# Altium PCB switch-box.PcbDoc (part 1 of 2)
Units mil, origin at the board's own origin, x right, y up, seen from the top; angles counter-clockwise.
Board outline 6910 x 3465 mil, 2 copper layers (Top Layer, Bottom Layer), stack 57 mil thick; 96 components, 105 nets, 379 pads, 100 vias.
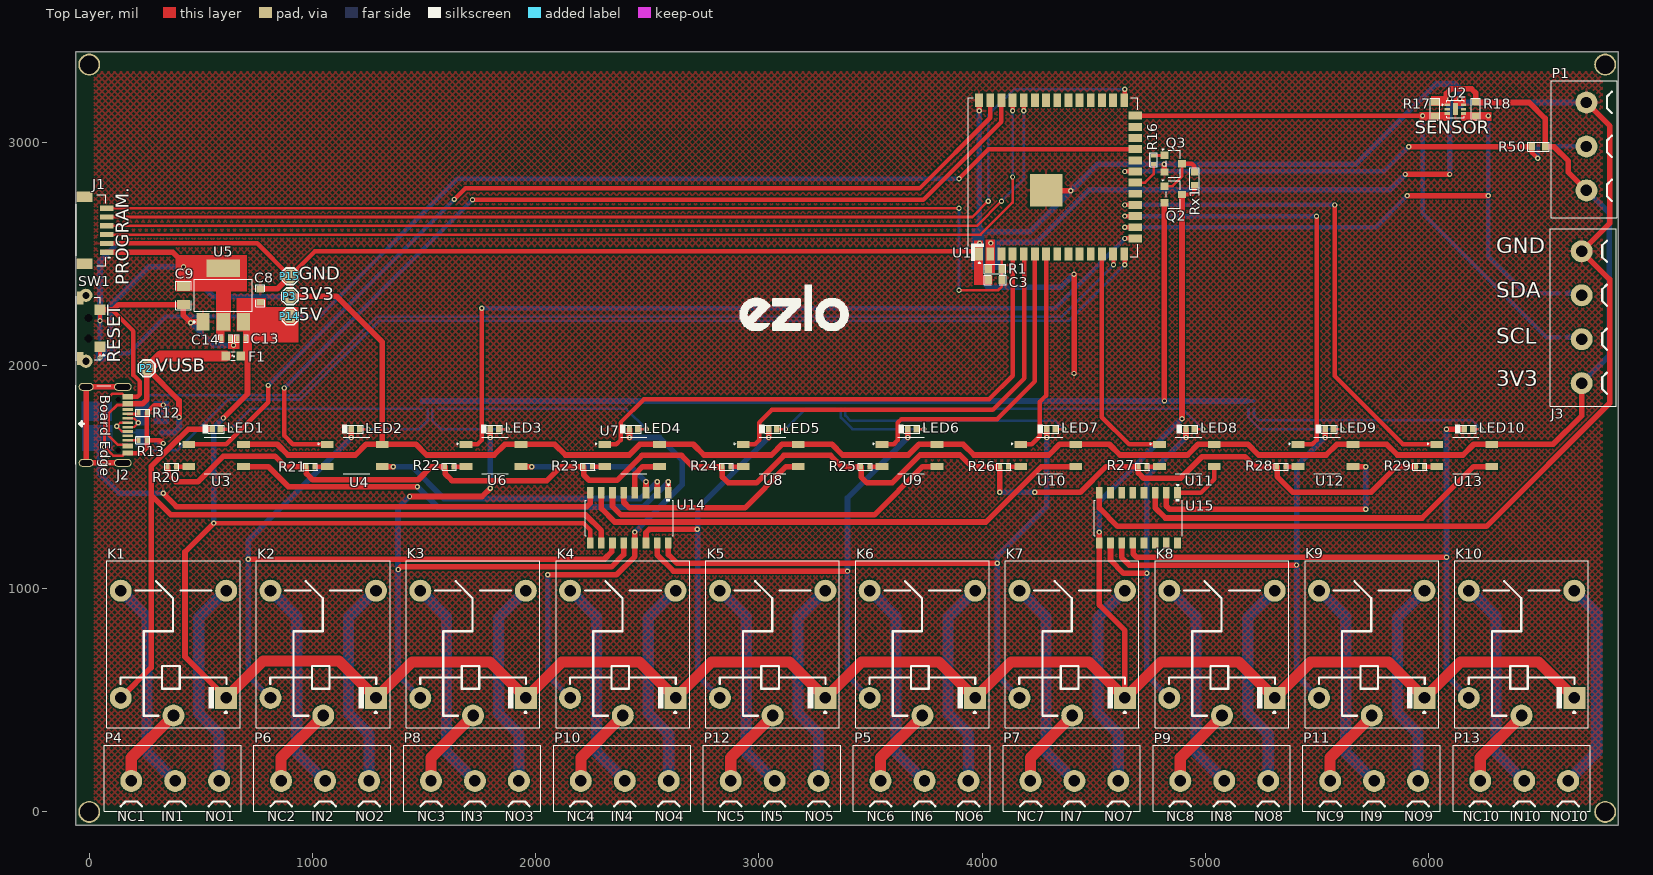
[diagram p0: Top Layer view]
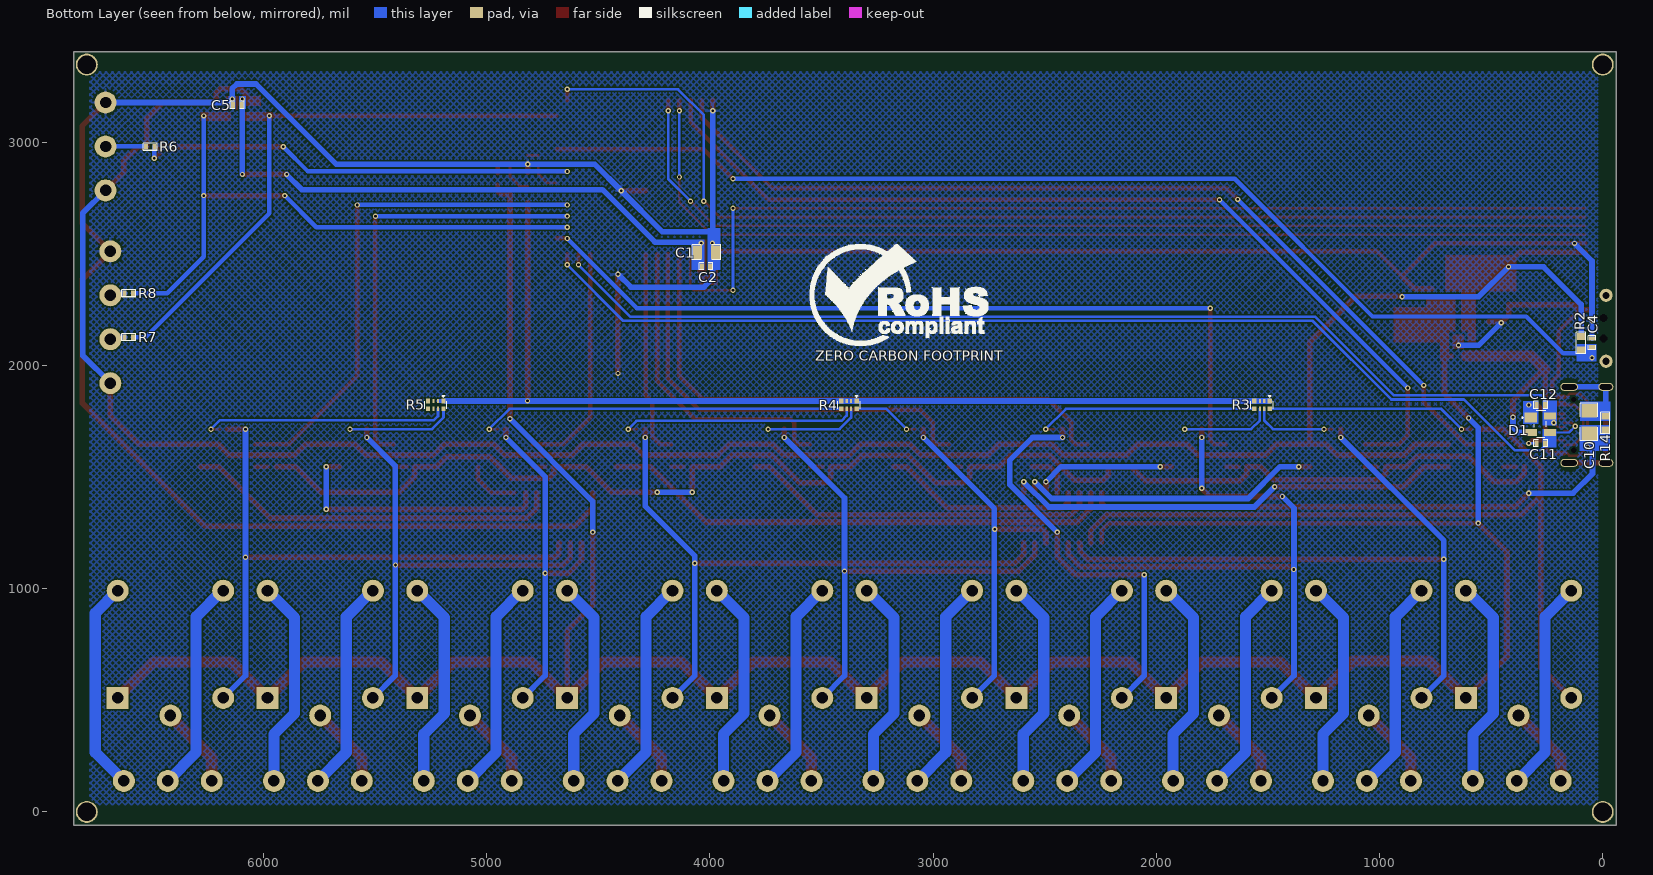
[diagram p1: Bottom Layer view, seen from below]

## Layer stack, top to bottom
Top Solder: solder mask 3, Solder Resist, Dk 3.5
Top Layer: signal copper 10
Dielectric 1: core 37, Core-041, Dk 4.8
Bottom Layer: signal copper 10
Bottom Solder: solder mask 3, Solder Resist, Dk 3.5

## Board outline
-60,-59 6850,-59 6850,3406 -60,3406

## Design rules (kind name [scope] priority, off if disabled: settings)
Clearance [All] p1: gap=6 ignorepadtopadclearanceinfootprint=FALSE except(4: Arc-SMDPad Track-SMDPad SMDPad-SMDPad)
ComponentClearance [All] p1: gap=0 collisioncheckmode=3 verticalgap=0 showdistances=FALSE
HoleSize [All] p1: absolutevalues=TRUE maxlimit=10000 minlimit=1 maxpercent=80.000 minpercent=20.000
HoleToHoleClearance [All] p1: gap=0 allowstackedmicrovias=TRUE
MinimumSolderMaskSliver [All] p1: minsoldermaskwidth=0
PolygonConnect [All] p1: connectstyle=Relief reliefconductorwidth=10 reliefentries=4 polygonreliefangle="90 Angle" airgapwidth=10
RoutingVias [All] p1: holewidth=11.81 width=23.62 viastyle="Through Hole" minholewidth=11.81 minwidth=23.62 maxholewidth=31.5 maxwidth=62.99
SilkToSilkClearance [All] p1: silktosilkclearance=0
SilkToSolderMaskClearance [IsPad] p1: minsilkscreentomaskgap=0 clearancetoexposedcopper=TRUE
SolderMaskExpansion [All] p1: expansion=4 istentingtop=FALSE
Width [All] p1: maxlimit=50 minlimit=10 preferedwidth=15 minimp=50.000000 maximp=50.000000 favimp=50.000000
24 further rules are at their usual default settings.

## Classes and differential pairs
component class "U_USB & LDO_Section": C8 C9 C10 C11 C12 C13 C14 D1 F1 J2 P2 P3 P14 P15 R12 R13 R14 U5
component class U_Sensor_Section: C5 J3 R7 R8 R17 R18 U2
component class U_Relay_Section: K1 K2 K3 K4 K5 K6 K7 K8 K9 K10
component class U_Isolator_Section: R20 R21 R22 R23 R24 R25 R26 R27 R28 R29 U3 U4 U6 U7 U8 U9 U10 U11 U12 U13
component class U_Driver_Section: D13 D14 D15 D16 D17 D18 D19 D20 D21 D22 U14 U15
component class U_Controller_Section: C1 C2 C3 C4 J1 LED1 LED2 LED3 LED4 LED5 LED6 LED7 LED8 LED9 LED10 P1 Q2 Q3 R1 R2 R3 R4 R5 R6 R16 R50 Rx1 SW1 U1
component class U_Connector_Section: P4 P5 P6 P7 P8 P9 P10 P11 P12 P13

## Components (designator, comment, footprint, x,y, rotation, side; value= is the part's Value field where it differs from the comment)
C1 "22uF" Cap-0805 4015,2507 r180 bottom locked
C2 "0.1uF" Cap-0402 4017,2445 r180 bottom locked
C3 "1uF" Cap-0603 4058,2383 r0 top locked
C4 "0.1uF" Cap-0402 48,2102 r270 bottom locked
C5 "0.1uF" Cap-0402 6117,3167 r0 bottom locked
C8 "10uF" Cap-0603 766,2313 r90 top locked
C9 "22uF" Cap-0805 422,2313 r270 top locked
C10 "4.7nF" Cap-1206 61,1747 r270 bottom locked
C11 "TBD" Cap-0402 278,1651 r0 bottom locked
C12 "TBD" Cap-0402 278,1823 r0 bottom locked
C13 "1uF" Cap-0402 682,2121 r180 top locked
C14 "4.7uF" Cap-0402 611,2121 r0 top locked
D1 "SP0503BAHTG" SOT-143-4_ 322.61,1766.93 r180 bottom locked
F1 "BSMD0603L-100" fuse-0603 645,2042 r0 top locked
J1 "Voltlink Target" "VOLTLINK TARGET" 28,2606 r90 top locked
J2 "TYPE-C-31-M-12" TYPE-C-31-M-12_ 173,1859.83 r270 top locked
J3 "WJ301V-5.0-4P-12-00A" WJ301V-5.0-4P-12-00A 6685.64,2216.15 r90 top locked
K1 "JQC-3FF/005-1ZS(551)" JQC-3FF/005-1ZS(551) 377.31,750.9 r90 top locked
K2 "JQC-3FF/005-1ZS(551)" JQC-3FF/005-1ZS(551) 1048.33,750.9 r90 top locked
K3 "JQC-3FF/005-1ZS(551)" JQC-3FF/005-1ZS(551) 1719.34,750.9 r90 top locked
K4 "JQC-3FF/005-1ZS(551)" JQC-3FF/005-1ZS(551) 2390.36,750.9 r90 top locked
K5 "JQC-3FF/005-1ZS(551)" JQC-3FF/005-1ZS(551) 3061.38,750.9 r90 top locked
K6 "JQC-3FF/005-1ZS(551)" JQC-3FF/005-1ZS(551) 3732.39,750.9 r90 top locked
K7 "JQC-3FF/005-1ZS(551)" JQC-3FF/005-1ZS(551) 4403.41,750.9 r90 top locked
K8 "JQC-3FF/005-1ZS(551)" JQC-3FF/005-1ZS(551) 5074.43,750.9 r90 top locked
K9 "JQC-3FF/005-1ZS(551)" JQC-3FF/005-1ZS(551) 5745.44,750.9 r90 top locked
K10 "JQC-3FF/005-1ZS(551)" JQC-3FF/005-1ZS(551) 6416.46,750.9 r90 top locked
LED1 "Green" LED-0402 569.06,1715 r180 top locked
LED2 "Green" LED-0402 1192.3,1715 r180 top locked
LED3 "Green" LED-0402 1815.54,1715 r180 top locked
LED4 "Green" LED-0402 2438.78,1715 r180 top locked
LED5 "Green" LED-0402 3062.02,1715 r180 top locked
LED6 "Green" LED-0402 3685.25,1715 r180 top locked
LED7 "Green" LED-0402 4308.49,1715 r180 top locked
LED8 "Green" LED-0402 4931.73,1715 r180 top locked
LED9 "Green" LED-0402 5554.97,1715 r180 top locked
LED10 "Green" LED-0402 6178.21,1715 r180 top locked
P1 "WJ301V-5.0-3P" WJ301V-5.0-3P 6707,2981.15 r90 top
P2 "TEST POINT" Test-point 258,1988 r0 top locked
P3 "TEST POINT" Test-point 899,2310 r0 top locked
P4 "WJ301V-5.0-3P" WJ301V-5.0-3P 385,139 r0 top locked
P5 "WJ301V-5.0-3P" WJ301V-5.0-3P 3741.75,139 r0 top locked
P6 "WJ301V-5.0-3P" WJ301V-5.0-3P 1056.35,139 r0 top locked
P7 "WJ301V-5.0-3P" WJ301V-5.0-3P 4413.1,139 r0 top locked
P8 "WJ301V-5.0-3P" WJ301V-5.0-3P 1727.7,139 r0 top locked
P9 "WJ301V-5.0-3P" WJ301V-5.0-3P 5084.45,139 r0 top locked
P10 "WJ301V-5.0-3P" WJ301V-5.0-3P 2399.05,139 r0 top locked
P11 "WJ301V-5.0-3P" WJ301V-5.0-3P 5755.8,139 r0 top locked
P12 "WJ301V-5.0-3P" WJ301V-5.0-3P 3070.4,139 r0 top locked
P13 "WJ301V-5.0-3P" WJ301V-5.0-3P 6428.15,139 r0 top locked
P14 "TEST POINT" Test-point 899,2220 r0 top locked
P15 "TEST POINT" Test-point 899,2400 r0 top locked
Q2 "FDN306P" SOT-23 4856,2766 r270 top locked
Q3 "S8050" SOT-23 4856,2904 r270 top locked
R1 "10K" RES-0603 4058,2432 r180 top locked
R2 "10K" RES-0603 97,2100 r90 bottom locked
R3 "330R" Res-0402x4 1491.22,1841 r270 bottom locked
R4 "330R" Res-0402x4 3342.06,1841 r270 bottom locked
R5 "330R" Res-0402x4 5192.9,1841 r270 bottom locked
R6 "47R" Res-0402 6507,2980 r180 bottom locked
R7 "47R" Res-0402 6603,2127 r180 bottom locked
R8 "47R" Res-0402 6603,2323 r180 bottom locked
R12 "5.1K" Res-0402 240,1788 r180 top locked
R13 "5.1K" Res-0402 240,1665 r180 top locked
R14 "1M" Res-0603 -11,1742 r90 bottom locked
R16 "100K" Res-0402 4768,2922 r270 top locked
R17 "10K" Res-0603 6029,3149 r90 top locked
R18 "10K" Res-0603 6211,3149 r90 top locked
R20 "100R" Res-0402 370,1547 r0 top locked
R21 "100R" Res-0402 991.22,1547 r0 top locked
R22 "100R" Res-0402 1612.44,1547 r0 top locked
R23 "100R" Res-0402 2233.67,1547 r0 top locked
R24 "100R" Res-0402 2854.89,1547 r0 top locked
R25 "100R" Res-0402 3476.11,1547 r0 top locked
R26 "100R" Res-0402 4097.33,1547 r0 top locked
R27 "100R" Res-0402 4718.56,1547 r0 top locked
R28 "100R" Res-0402 5339.78,1547 r0 top locked
R29 "100R" Res-0402 5961,1547 r0 top locked
R50 "10K" Res-0603 6492,2980 r0 top locked
Rx1 "10K" RES-0603 4952,2837 r90 top locked
SW1 "YTS-B003-2A" YTS-B003-2A 3.89,2166.72 r90 top locked
U1 "ESP32-S3-WROOM-1U-N4" "41-SMD UFL MODULE" 4336,2844 r90 top locked
U2 "GXHTC3" DFN-6-EP(2x2) 6119.66,3148.46 r0 top locked
U3 "IS181GB" SOP-4_2.54 568.27,1597 r0 top locked
U4 "IS181GB" SOP-4_2.54 1189.51,1597 r0 top locked
U5 "LDL1117S33R" "SOT- 223" 600.55,2316.08 r0 top locked
U6 "IS181GB" SOP-4_2.54 1810.75,1597 r0 top locked
U7 "IS181GB" SOP-4_2.54 2431.99,1597 r0 top locked
U8 "IS181GB" SOP-4_2.54 3053.23,1597 r0 top locked
U9 "IS181GB" SOP-4_2.54 3674.47,1597 r0 top locked
U10 "IS181GB" SOP-4_2.54 4295.71,1597 r0 top locked
U11 "IS181GB" SOP-4_2.54 4916.94,1597 r0 top locked
U12 "IS181GB" SOP-4_2.54 5538.18,1597 r0 top locked
U13 "IS181GB" SOP-4_2.54 6159.42,1597 r0 top locked
U14 "ULN2003AD" 16-SOIC 2594,1430 r270 top locked
U15 "ULN2003AD" 16-SOIC 4875,1430 r270 top locked

## Footprints (in the part's own frame and the unit in brackets; to place one, negate y for a bottom-side part, rotate by r counter-clockwise, add the part's x,y. Pads: shape width x height; smd on the part's side, far side on the other; paste and mask are expansions set on the pad)
16-SOIC [mm]
  rect 1.27x0.76 smd: 1(0,0) 2(0,-1.27) 3(0,-2.54) 4(0,-3.81) 5(0,-5.08) 6(0,-6.35) 7(0,-7.62) 8(0,-8.89) 9(5.72,-8.89) 10(5.72,-7.62) 11(5.72,-6.35) 12(5.72,-5.08) 13(5.72,-3.81) 14(5.72,-2.54) 15(5.72,-1.27) 16(5.72,0)
  silkscreen extent -0.91,-9.45 4.88,0.56, body extent -0.14,-9.4 5.86,0.51, height 1.75
"41-SMD UFL MODULE" [mm]
  rect 1.5x0.9 smd: 1(-8.75,8.88) 2(-8.75,7.61) 3(-8.75,6.34) 4(-8.75,5.07) 5(-8.75,3.8) 6(-8.75,2.53) 7(-8.75,1.26) 8(-8.75,-0.01) 9(-8.75,-1.28) 10(-8.75,-2.55) 11(-8.75,-3.82) 12(-8.75,-5.09) 13(-8.75,-6.36) 14(-8.75,-7.63) 27(8.75,-7.63) 28(8.75,-6.36) 29(8.75,-5.09) 30(8.75,-3.82) 31(8.75,-2.55) 32(8.75,-1.28) 33(8.75,-0.01) 34(8.75,1.26) 35(8.75,2.53) 36(8.75,3.8) 37(8.75,5.07) 38(8.75,6.34) 39(8.75,7.61) 40(8.75,8.88)
  rect 0.9x1.5 smd: 15(-6.98,-8.88) 16(-5.71,-8.88) 17(-4.44,-8.88) 18(-3.17,-8.88) 19(-1.9,-8.88) 20(-0.63,-8.88) 21(0.64,-8.88) 22(1.91,-8.88) 23(3.18,-8.88) 24(4.45,-8.88) 25(5.72,-8.88) 26(6.99,-8.88)
  rect 3.7x3.7 smd: 41(-1.5,1.26)
  silkscreen extent -9.8,-9.17 9.05,10.11, body extent -9,-9.12 10.99,123, height 7.73
Cap-0402 [mil]
  rect 18x25 smd mask+2.36: 1(-18.5,0) 2(18.5,0)
  silkscreen extent -31,-16 31,16, body extent -20,-10 20,10, height 19
Cap-0603 [mil]
  rect 30x35 smd mask+2.36: 1(-30,0) 2(30,0)
  silkscreen extent -49,-21 49,21, body extent -32,-16 31,16, height 34
Cap-0805 [mil] "SMD 0805"
  rect 40x60 smd mask+2.76: 1(-40,0) 2(40,0)
  silkscreen extent -64,-34 64,34, body extent -39,-25 39,25, height 30
Cap-1206 [mil] "SMD 1206"
  rect 60x70 smd: 1(-50,0) 2(50,0)
  silkscreen extent -84,-39 84,39, body extent -63,-31 63,32, height 39
DFN-6-EP(2x2) [mm]
  rect 0.6x0.3 smd: 1(-0.917,0.5) 2(-0.917,0) 3(-0.917,-0.5) 4(0.918,-0.5) 5(0.918,0) 6(0.918,0.5)
  rect 0.56x1.37 smd: 7(0,0)
  silkscreen extent -1.5,-1 1,1, body extent -1.01,-1 1.01,1, height 0.76
fuse-0603 [mm]
  rect 1x1 smd: 1(-0.85,0) 2(0.85,0)
  silkscreen extent -0.25,-0.48 0.25,0.48, body extent -0.77,-0.42 0.78,0.43, height 0.45
JQC-3FF/005-1ZS(551) [mm]
  rect 2.5x2.5 hole 1.32: 1(-6.1,-6)
  round 2.5 hole 1.32: 2(-6.1,6) 3(6.1,6) 4(-8.1,0) 5(6.1,-6)
  silkscreen extent -9.5,-7.6 9.5,7.61, body extent -9.5,-7.6 9.5,7.6, height 15
LED-0402 [mm]
  rect 0.62x0.72 smd: 1(-0.475,0) 2(0.475,0)
  silkscreen extent -0.89,-0.51 1.55,0.51, body extent -0.5,-0.25 0.51,0.25, height 0.45
Res-0402 [mil]
  rect 18x25 smd mask+2.17: 1(-18.5,0) 2(18.5,0)
  silkscreen extent -32,-17 32,16, body extent -23,-11 23,11, height 16
Res-0402x4 [mm]
  rect 0.525x0.5 smd mask+0.055: 1(0,0) 4(0,-1.775) 5(0.9,-1.775) 8(0.9,0)
  rect 0.5x0.25 smd mask+0.055: 2(0,-0.637) 3(0,-1.137) 6(0.9,-1.137) 7(0.9,-0.637)
  silkscreen extent -0.58,-2.16 0.86,0.38
RES-0603 [mil]
  rect 30x35 smd: 1(-30,0) 2(30,0)
  silkscreen extent -48,-21 48,21, body extent -31,-17 31,17, height 18
Res-0603 [mil]
  rect 30x35 smd: 1(-30,0) 2(30,0)
  silkscreen extent -48,-21 48,21, body extent -31,-17 31,17, height 18
SOP-4_2.54 [mm]
  rect 1.45x0.8 smd: 1(-3.125,1.27) 2(-3.125,-1.27) 3(3.125,-1.27) 4(3.125,1.27)
  silkscreen extent -4.14,-2.06 1.68,2.06, body extent -3.43,-2 3.43,2, height 2.02
SOT-23 [mm] "TRANS NPN 40V 0.6A SOT23"
  rect 0.82x0.92 smd: 1(-0.95,-1) 2(0.95,-1) 3(0,1)
  silkscreen extent -1.68,-1.3 1.55,0.81, body extent -1.5,-1.25 1.5,1.25, height 1.05
SOT-143-4_ [mm]
  rect 1.4x1.1 smd: 1(0,0)
  rect 1.4x0.8 smd: 2(0,-1.7) 3(2.2,-1.7) 4(2.2,0.2)
  silkscreen extent -0.99,-2.27 1.76,0.77, body extent -0.08,-2.21 2.29,0.71, height 1.22
"SOT- 223" [mm]
  rect 1.5x2 smd: 1(-2.3,-3.05) 2(0,-3.05) 3(2.3,-3.05)
  rect 3.8x2 smd: 4(0,3.05)
  silkscreen extent -3.35,-3.2 3.3,1.8, body extent -3.25,-3.5 3.25,3.5, height 1.61
Test-point [mil]
  oct 60x60 smd: 1(0,0)
  silkscreen extent -37,-37 37,37
TYPE-C-31-M-12_ [mm]
  rect 0.6x1.2 smd: A1/B12(0,0) A4/B9(0.8,0) B1/A12(6.4,0) B4/A9(5.6,0)
  rect 0.3x1.2 smd: A5(1.95,0) A6(2.95,0) A7(3.45,0) A8(4.45,0) B5(4.95,0) B6(3.95,0) B7(2.45,0) B8(1.45,0)
  round 0 hole 0.62 unplated: MH(0.31,-1.07) MH(6.09,-1.07)
  oval 0.9x2 hole 0.6 slot 1.7 at 90 deg: S1(7.525,-0.57) S4(-1.125,-0.57)
  oval 0.9x1.7 hole 0.6 slot 1.4 at 90 deg: S2(7.525,-4.75) S3(-1.125,-4.75)
  silkscreen extent -1.3,-5.94 7.7,-1.93, body extent -1.27,-7.32 7.67,0.58, height 3.31
"VOLTLINK TARGET" [mm]
  rect 0.6x1.55 smd: 1(-2.5,-1.262) 2(-1.5,-1.262) 3(-0.5,-1.262) 4(0.5,-1.262) 5(1.5,-1.262) 6(2.5,-1.262)
  rect 1.2x1.8 smd: MP1(-3.8,1.262) MP2(3.8,1.262)
  silkscreen extent -4.06,-1.68 4.06,2.17, body extent -4,-1.49 4,2.11, height 4.25
WJ301V-5.0-3P [mm]
  round 2.5 hole 1.3: 1(-5,0) 2(0,0) 3(5,0)
  silkscreen extent -8.1,-3.45 7.5,4.06, body extent -8.1,-3.44 7.5,4.05, height 10
WJ301V-5.0-4P-12-00A [mm]
  round 2.5 hole 1.3: 1(-7.5,0) 2(-2.5,0) 3(2.5,0) 4(7.5,0)
  silkscreen extent -10.12,-3.94 10.05,3.58, body extent -10.03,-4.12 9.97,3.48, height 2.79
YTS-B003-2A [mm]
  rect 1.2x1.2 smd: 1(-2.1,-1.125) 2(2.1,-1.125)
  rect 1.5x0.7 smd: 3(3.45,1.125) 4(-3.45,1.125)
  round 1.5 hole 0.8: 5(3.75,0.475) 6(-3.75,0.475)
  round 0 hole 0.9 unplated: MH0(-1.15,0.175) MH1(1.15,0.175)
  silkscreen extent -3.68,-1.68 3.66,1.6, body extent -3.7,-1.37 3.7,2.36, height 3.59

## Part data
C1 C9: library part CL21A226MAYNNNE, "CAP CER 22UF 25V X5R 0805", LCSC Part Number=C602037, Manufacturer=Samsung, Supplier Part Number 1=187-CL21A226MAYNNNE, Category="Ceramic Capacitors", Manufacturer Part Number=CL21A226MAYNNNE, Pricing 1="1=0.28000, 10=0.18500, 50=0.18500, 100=0.10600, 500=0.07500, 1000=0.06400, 2000=0.06100, 10000=0.05400, 24000=0.05100, 50000=0.04600 (USD)", RoHS=Yes, RoHS Compliant=Yes, Stock 1=1240410, Supplier 1=Mouser
C2 C4 C5: library part C1005X5R1H104K050BB, "CAP CER 0.1UF 50V X5R 0402", Capacitance=100nF, Case Code (Imperial)=0402, Case Code (Metric)=1005, Dielectric=X5R, Dielectric Material=Ceramic, LCSC Part Number=C2181865, Manufacturer=TDK, Max Operating Temperature=85°C, Min Operating Temperature=-55°C, Package Quantity=1, Supplier Part Number 1=445-5942-1-ND, Tolerance=10%, Voltage=50V, Case/Package=0402, ComponentLink1Description=https://product.tdk.com/info/en/catalog/spec/mlccspec_commercial_general_midvoltage_en.pdf?src-supplier=Digi-Key, ComponentLink1URL=https://product.tdk.com/info/en/catalog/spec/mlccspec_commercial_general_midvoltage_en.pdf?src-supplier=Digi-Key, ComponentLink2Description=http://www.tdk.co.jp/tefe02/e413_c.pdf?src-supplier=Future+Electronics, ComponentLink2URL=http://www.tdk.co.jp/tefe02/e413_c.pdf?src-supplier=Future+Electronics, ComponentLink3Description=https://www.verical.com/server-webapp/html/getDatasheet?partID=743571&src-supplier=Verical, ComponentLink3URL=https://www.verical.com/server-webapp/html/getDatasheet?partID=743571&src-supplier=Verical, ComponentLink4Description=http://www.tdk.co.jp/tefe02/e412_c.pdf?src-supplier=Avnet+Europe, ComponentLink4URL=http://www.tdk.co.jp/tefe02/e412_c.pdf?src-supplier=Avnet+Europe, Construction=Flat, Depth=0.5mm, Height=0.5mm, Lead Free="Lead Free", Length=1mm, Manufacturer Part Number=C1005X5R1H104K050BB, Mount="Surface Mount", Packaging="Tape and Reel", Pricing 1="1=0.12, 10=0.09, 50=0.049, 100=0.04, 500=0.02858, 1000=0.02245, 2500=0.02041, 5000=0.01878 (USD)", Radiation Hardening=No, REACH SVHC="No SVHC", Resistor Type=Ceramic, RoHS Compliant=Yes, Series=C, Stock 1=1455182, Supplier 1=Digi-Key, Termination=SMD/SMT, Thickness=0.022inch, Voltage Rating=50V, Voltage Rating (DC)=50V, Weight=2.3E-05oz, Width=0.02inch
C3: library part CC0603KRX5R8BB105, "CAP CER 1UF 25V X5R 0603", Case Code (Imperial)=0603, Case Code (Metric)=1608, Dielectric=X5R, LCSC Part Number=C14664, Manufacturer=Yageo, Max Operating Temperature=85°C, Min Operating Temperature=-55°C, Package Quantity=1, Supplier Part Number 1=311-1445-1-ND, Tolerance=10%, Voltage Rating=25V, Capacitance=1uF, Case/Package=0603, Category="Ceramic Capacitors", ComponentLink1Description=https://datasheet.ciiva.com/176/mlccorderingcode-176785.pdf?src-supplier=Digi-Key, ComponentLink1URL=https://datasheet.ciiva.com/176/mlccorderingcode-176785.pdf?src-supplier=Digi-Key, ComponentLink2Description=https://datasheet.ciiva.com/176/mlccorderingcode-176786.pdf?src-supplier=Digi-Key, ComponentLink2URL=https://datasheet.ciiva.com/176/mlccorderingcode-176786.pdf?src-supplier=Digi-Key, ComponentLink3Description=https://datasheet.ciiva.com/176/mlccorderingcode-176787.pdf?src-supplier=Digi-Key, ComponentLink3URL=https://datasheet.ciiva.com/176/mlccorderingcode-176787.pdf?src-supplier=Digi-Key, ComponentLink4Description=https://datasheet.ciiva.com/17436/upy-gphc-x5r-4v-to-50v-12-17436952.pdf?src-supplier=Avnet+Europe, ComponentLink4URL=https://datasheet.ciiva.com/17436/upy-gphc-x5r-4v-to-50v-12-17436952.pdf?src-supplier=Avnet+Europe, ComponentLink5Description=https://datasheet.ciiva.com/7978/1525783-7978171.pdf?src-supplier=Element14, ComponentLink5URL=https://datasheet.ciiva.com/7978/1525783-7978171.pdf?src-supplier=Element14, ComponentLink6Description=https://datasheet.ciiva.com/11586/upy-gphc-x5r-4v-to-50v-12-11586318.pdf?src-supplier=Avnet, ComponentLink6URL=https://datasheet.ciiva.com/11586/upy-gphc-x5r-4v-to-50v-12-11586318.pdf?src-supplier=Avnet, Construction=Flat, Depth=0.8mm, Halogen Free="Halogen Free", Height=0.8mm, Lead Free="Lead Free", Length=1.6mm, Manufacturer Part Number=CC0603KRX5R8BB105, Mount="Surface Mount", Number of Pins=2, Packaging="Tape and Reel", Pricing 1="1=0.12000, 10=0.08400, 50=0.04760, 100=0.03940, 500=0.02764, 1000=0.02288 (USD)", Radiation Hardening=No, REACH SVHC="No SVHC", RoHS=Yes, RoHS Compliant=Yes, Series=CC, Stock 1=919939, Supplier 1=Digi-Key, Termination=SMD/SMT, Thickness=0.035inch, Voltage Rating (DC)=25V, Width=0.031inch
C8: library part C1608X5R1E106M080AC, "CAP CER 10UF 25V X5R 0603", Case Code (Imperial)=0603, Case Code (Metric)=1608, Dielectric=X5R, Dielectric Material=Ceramic, LCSC Part Number=C2168289, Manufacturer=TDK, Max Operating Temperature=85°C, Min Operating Temperature=-55°C, Package Quantity=1, Supplier Part Number 1=445-9015-1-ND, Tolerance=20%, Voltage Rating=25V, Capacitance=10uF, Case/Package=0603, Composition=Ceramic, Depth=0.8mm, Height=0.8mm, Lead Free="Lead Free", Length=1.6mm, Manufacturer Part Number=C1608X5R1E106M080AC, Mount="Surface Mount", Packaging="Tape and Reel", Pricing 1="1=0.96, 10=0.704, 100=0.483, 500=0.38238, 1000=0.322 (USD)", REACH SVHC="No SVHC", Stock 1=61681, Supplier 1=Digi-Key, Termination=SMD/SMT, Thickness=0.039inch, Voltage Rating (DC)=25V, Weight=7.1E-05oz, Width=0.8mm
C10: library part CC1206KKX7RCBB472, "CAP CER 4700PF 1KV X7R 1206", Case Code (Imperial)=1206, Case Code (Metric)=3216, Dielectric=X7R, Dielectric Material=Ceramic, LCSC Part Number=C107198, Manufacturer=Yageo, Max Operating Temperature=125°C, Min Operating Temperature=-55°C, Supplier Part Number 1=7130131, Tolerance=10%, Voltage Rating=1kV, Capacitance=4.7nF, Case/Package=1206, Category="Ceramic Capacitors", ComponentLink1Description=https://datasheet.ciiva.com/13208/upy-gp-np0-16v-to-50v-8-13208693.pdf?src-supplier=Mouser, ComponentLink1URL=https://datasheet.ciiva.com/13208/upy-gp-np0-16v-to-50v-8-13208693.pdf?src-supplier=Mouser, ComponentLink2Description=https://datasheet.ciiva.com/11466/hv-11466701.pdf?src-supplier=Avnet, ComponentLink2URL=https://datasheet.ciiva.com/11466/hv-11466701.pdf?src-supplier=Avnet, Depth=1.6mm, Item Type=Capacitor, Lead Free="Lead Free", Length=3.2mm, Manufacturer Part Number=CC1206KKX7RCBB472, Mount="Surface Mount", Number of Pins=2, Packaging="Tape and Reel", Pricing 1="3000=0.02860, 9000=0.02750, 15000=0.02700, 45000=0.02600, 75000=0.02510 (USD)", Radiation Hardening=No, Resistor Type=Ceramic, RoHS=Yes, RoHS Compliant=Yes, Series=CC, Stock 1=180000, Supplier 1="Future Electronics", Termination=SMD/SMT, Thickness=0.057inch, Voltage Rating (DC)=1kV, Weight=0.000571oz, Width=0.063inch
C11 C12: library part "Capacitor 0402", "DO Not Mount"
C13: library part CC0402KRX5R6BB105, "CAP CER 1UF 10V X5R 0402", Case Code (Imperial)=0402, Case Code (Metric)=1005, Dielectric=X5R, LCSC Part Number=C106254, Manufacturer=Yageo, Max Operating Temperature=85°C, Min Operating Temperature=-55°C, Package Quantity=1, Resistor Type=Ceramic, Supplier Part Number 1=603-CC402KRX5R6BB105, Tolerance=10%, Voltage Rating=10V, Capacitance=1uF, Case/Package=0402, Category="Ceramic Capacitors", ComponentLink1Description=https://datasheet.ciiva.com/176/upy-gphc-x5r-4v-to-50v-12-176704.pdf?src-supplier=Digi-Key, ComponentLink1URL=https://datasheet.ciiva.com/176/upy-gphc-x5r-4v-to-50v-12-176704.pdf?src-supplier=Digi-Key, ComponentLink2Description=https://datasheet.ciiva.com/176/mlccorderingcode-176705.pdf?src-supplier=Digi-Key, ComponentLink2URL=https://datasheet.ciiva.com/176/mlccorderingcode-176705.pdf?src-supplier=Digi-Key, ComponentLink3Description=https://datasheet.ciiva.com/176/mlccorderingcode-176706.pdf?src-supplier=Digi-Key, ComponentLink3URL=https://datasheet.ciiva.com/176/mlccorderingcode-176706.pdf?src-supplier=Digi-Key, Construction=Flat, Depth=0.5mm, Dissipation Factor=15%, Halogen Free="Halogen Free", Height=0.5mm, Lead Free="Lead Free", Length=1mm, Manufacturer Part Number=CC0402KRX5R6BB105, Mount="Surface Mount", Number of Pins=2, Packaging="Tape and Reel", Pricing 1="1=0.11000, 10=0.05500, 50=0.05500, 100=0.03300, 500=0.02700, 1000=0.02200, 2500=0.02100, 10000=0.01800 (USD)", Radiation Hardening=No, REACH SVHC="No SVHC", RoHS=Yes, RoHS Compliant=Yes, Series=CC, Stock 1=6711367, Supplier 1=Mouser, Termination=SMD/SMT, Thickness=0.022inch, Voltage Rating (DC)=10V, Width=0.02inch
C14: library part CC0402KRX5R6BB475, "CAP CER 4.7UF 10V X5R 0402", Case Code (Imperial)=0402, Case Code (Metric)=1005, LCSC Part Number=C326586, Manufacturer=Yageo, Max Operating Temperature=85°C, Min Operating Temperature=-55°C, Supplier Part Number 1=3871698, Tolerance=10%, Voltage Rating=10V, Capacitance=4.7uF, Case/Package=0402, Category="Ceramic Capacitors", ComponentLink1Description=http://www.yageo.com/documents/recent/UPY-GPHC_X5R_4V-to-50V_25.pdf?src-supplier=Digi-Key, ComponentLink1URL=http://www.yageo.com/documents/recent/UPY-GPHC_X5R_4V-to-50V_25.pdf?src-supplier=Digi-Key, Manufacturer Part Number=CC0402KRX5R6BB475, Mount="Surface Mount", Packaging="Cut Tape", Pricing 1="10000=0.02310, 50000=0.02100 (GBP)", RoHS=Yes, RoHS Compliant=Yes, Stock 1=20000, Supplier 1=Farnell
D1: "ESD Suppressor TVS 5.5V 4-Pin(3+Tab) SOT-143 T/R", Breakdown Voltage=5.5V, Capacitance=30pF, Case/Package=SOT-143, Clamping Voltage=7.8V, Clamping Voltage-Max=8V, LCSC Part Number=C3029025, Leakage Current=100nA, Manufacturer=Littelfuse, Max Operating Temperature=85°C, Max Power Dissipation=225mW, Min Operating Temperature=-40°C, Power Line Protection=No, Resistor Type=Zener, Supplier Part Number 1=F2715CT-ND, Voltage Rating (DC)=5V, Category=Diodes, ComponentLink1Description=https://datasheet.ciiva.com/15143/getdatasheetpartid-116020-15143550.pdf?src-supplier=Verical, ComponentLink1URL=https://datasheet.ciiva.com/15143/getdatasheetpartid-116020-15143550.pdf?src-supplier=Verical, ComponentLink2Description=https://datasheet.ciiva.com/332/sp05xxba-332550.pdf?src-supplier=Digi-Key, ComponentLink2URL=https://datasheet.ciiva.com/332/sp05xxba-332550.pdf?src-supplier=Digi-Key, ComponentLink3Description=https://datasheet.ciiva.com/8062/littefuse-spa-sp050x-8062422.pdf?src-supplier=Element14, ComponentLink3URL=https://datasheet.ciiva.com/8062/littefuse-spa-sp050x-8062422.pdf?src-supplier=Element14, ComponentLink4Description=https://datasheet.ciiva.com/22697/1911798-22697942.pdf?src-supplier=Element14, ComponentLink4URL=https://datasheet.ciiva.com/22697/1911798-22697942.pdf?src-supplier=Element14, ComponentLink5Description=https://datasheet.ciiva.com/332/sp05xxba-332551.pdf?src-supplier=Digi-Key, ComponentLink5URL=https://datasheet.ciiva.com/332/sp05xxba-332551.pdf?src-supplier=Digi-Key, ComponentLink6Description=https://datasheet.ciiva.com/16449/sp05xxba-16449463.pdf?src-supplier=Future+Electronics, ComponentLink6URL=https://datasheet.ciiva.com/16449/sp05xxba-16449463.pdf?src-supplier=Future+Electronics, ComponentLink7Description=https://datasheet.ciiva.com/332/sp05xxba-332552.pdf?src-supplier=Digi-Key, ComponentLink7URL=https://datasheet.ciiva.com/332/sp05xxba-332552.pdf?src-supplier=Digi-Key, ComponentLink8Description=https://datasheet.ciiva.com/4509/sp05x-leadfree-4509162.pdf?src-supplier=Mouser, ComponentLink8URL=https://datasheet.ciiva.com/4509/sp05x-leadfree-4509162.pdf?src-supplier=Mouser, ComponentLink9Description=https://datasheet.ciiva.com/7650/526672-7650894.pdf?src-supplier=Element14, ComponentLink9URL=https://datasheet.ciiva.com/7650/526672-7650894.pdf?src-supplier=Element14, Depth=1.4mm, Diode Type=Avalanche, Direction=Unidirectional, Element Configuration="Common Anode", ESD Protection=Yes, Height=1.05mm, Lead Free="Lead Free", Length=3.04mm, Manufacturer Part Number=SP0503BAHTG, Max Reverse Leakage Current=100nA, Mount="Surface Mount", Number of Channels=3, Number of Elements=3, Number of Pins=4, Number of Unidirectional Channels=3, Operating Supply Voltage=5.5V, Packaging="Tape and Reel", Peak Pulse Power=225mW, Polarity=Bidirectional,Unidirectional, Power Dissipation=225mW, Pricing 1="1=0.92000, 10=0.81200, 100=0.62260, 500=0.49214, 1000=0.39371 (USD)", Radiation Hardening=No, REACH SVHC="No SVHC", Reverse Standoff Voltage=5.5V, RoHS=Yes, RoHS Compliant=Yes, Series="SP05, SPA®", Stock 1=651, Supplier 1=Digi-Key, Termination=SMD/SMT, Width=1.4mm, Working Voltage=5.5V
F1: "6V 1A 50A 1W -40℃~+85℃ 2A 9mΩ 0.5s 80mΩ 0603 Resettable Fuses ROHS", LCSC Part Number=C2757929, Manufacturer=BHFUSE, Package=0603, ComponentLink1Description=LCSC, ComponentLink1URL=https://lcsc.com/product-detail/Resettable-Fuses_BHFUSE-BSMD0603L-100_C2757929.html, Item Type=Fuse, Manufacturer Part Number=BSMD0603L-100
J1: "DNP"
J2: "250mA 1 16 Female Type-C SMD USB Connectors ROHS", LCSC Part Number=C165948, Manufacturer="Korean Hroparts Elec", ComponentLink1Description=LCSC, ComponentLink1URL=https://www.lcsc.com/product-detail/USB-Connectors_Korean-Hroparts-Elec-TYPE-C-31-M-12_C165948.html, Manufacturer Part Number=TYPE-C-31-M-12
J3: "Plugin,P=5mm Screw terminal ROHS", LCSC Part Number=C3031442, Manufacturer="Ningbo Kangnex Elec", Package=Plugin,P=5mm, ComponentLink1Description=LCSC, ComponentLink1URL=https://www.lcsc.com/product-detail/Screw-terminal_Ningbo-Kangnex-Elec-WJ301V-5-0-4P-12-00A_C3031442.html, Item Type="Terminal Block", Manufacturer Part Number=WJ301V-5.0-4P-12-00A
K1 K2 K3 K4 K5 K6 K7 K8 K9 K10: "AgCdO 5V 10A SPDT (1 Form C) Electromagnetic Relay-Single Coil Plugin Power Relays ROHS", LCSC Part Number=C9221, Manufacturer="HF(Xiamen Hongfa Electroacoustic)", Package=Plugin, ComponentLink1Description=LCSC, ComponentLink1URL=https://www.lcsc.com/product-detail/Power-Relays_HF-Xiamen-Hongfa-Electroacoustic-JQC-3FF-005-1ZS-551_C9221.html, Item Type=Relay, Manufacturer Part Number=JQC-3FF/005-1ZS(551)
LED1 LED2 LED3 LED4 LED5 LED6 LED7 LED8 LED9 LED10: library part 16-213/GHC-YR1S1/3T, "Green 520~535nm 0402 Light Emitting Diodes (LED) RoHS", LCSC Part Number=C74338, Manufacturer="Everlight Elec", Package=0402, ComponentLink1Description=LCSC, ComponentLink1URL=https://www.lcsc.com/product-detail/Light-Emitting-Diodes-LED_Everlight-Elec-16-213-GHC-YR1S1-3T_C74338.html, Dominant Wavelength / Coordinate rank=520~535nm, Illumination Color=Green, Item Type=LED, Luminous Intensity (IF=20mA)=112~285mcd, Manufacturer Part Number=16-213/GHC-YR1S1/3T, Mounting Type="Surface Mount"
P1 P4 P5 P6 P7 P8 P9 P10 P11 P12 P13: "P=5.0mm Screw terminal RoHS", LCSC Part Number=C8483, Manufacturer="Ningbo Kangnex Elec", Package=Custom, ComponentLink1Description=LCSC, ComponentLink1URL=https://www.lcsc.com/product-detail/Screw-terminal_Ningbo-Kangnex-Elec-WJ301V-5-0-3P_C8483.html, Item Type="Terminal Block", Manufacturer Part Number=WJ301V-5.0-3P
P2 P3 P14 P15: "Test Point ON"
Q2: "MOSFET P-CH 12V 2.6A SUPERSOT3", Case/Package=TO-236-3, Continuous Drain Current (ID)=2.6A, Current=26A, Current Rating=-2.6A, Drain to Source Breakdown Voltage=-12V, Drain to Source Resistance=40mR, Drain to Source Voltage (Vdss)=12V, Drain-source On Resistance-Max=40MR, Gate to Source Voltage (Vgs)=8V, Input Capacitance=1.138nF, LCSC Part Number=C725031, Manufacturer="ON Semiconductor / Fairchild", Max Operating Temperature=150°C, Max Power Dissipation=500mW, Min Operating Temperature=-55°C, Package Quantity=3000, Supplier Part Number 1=FDN306PCT-ND, Threshold Voltage=-600mV, Category=MOSFETs, ComponentLink1Description=https://datasheet.ciiva.com/6383/fdn306p-6383301.pdf?src-supplier=Digi-Key, ComponentLink1URL=https://datasheet.ciiva.com/6383/fdn306p-6383301.pdf?src-supplier=Digi-Key, ComponentLink2Description=https://datasheet.ciiva.com/4439/fdn306p-50876-4439911.pdf?src-supplier=Mouser, ComponentLink2URL=https://datasheet.ciiva.com/4439/fdn306p-50876-4439911.pdf?src-supplier=Mouser, ComponentLink3Description=https://datasheet.ciiva.com/27050/889760-27050636.pdf?src-supplier=Jameco, ComponentLink3URL=https://datasheet.ciiva.com/27050/889760-27050636.pdf?src-supplier=Jameco, ComponentLink4Description=https://datasheet.ciiva.com/14170/fdn306p-eng-tds-14170925.pdf?src-supplier=Distrelec, ComponentLink4URL=https://datasheet.ciiva.com/14170/fdn306p-eng-tds-14170925.pdf?src-supplier=Distrelec, ComponentLink5Description=https://datasheet.ciiva.com/22700/264983-22700885.pdf?src-supplier=Element14, ComponentLink5URL=https://datasheet.ciiva.com/22700/264983-22700885.pdf?src-supplier=Element14, ComponentLink6Description=https://datasheet.ciiva.com/26144/fdn306p-26144214.pdf?src-supplier=Avnet+Europe, ComponentLink6URL=https://datasheet.ciiva.com/26144/fdn306p-26144214.pdf?src-supplier=Avnet+Europe, ComponentLink7Description=https://datasheet.ciiva.com/6383/fdn306p-6383304.pdf?src-supplier=Digi-Key, ComponentLink7URL=https://datasheet.ciiva.com/6383/fdn306p-6383304.pdf?src-supplier=Digi-Key, ComponentLink8Description=https://datasheet.ciiva.com/11175/fdn306p-11175160.pdf?src-supplier=Avnet, ComponentLink8URL=https://datasheet.ciiva.com/11175/fdn306p-11175160.pdf?src-supplier=Avnet, ComponentLink9Description=https://datasheet.ciiva.com/6383/fdn306p-6383306.pdf?src-supplier=Digi-Key, ComponentLink9URL=https://datasheet.ciiva.com/6383/fdn306p-6383306.pdf?src-supplier=Digi-Key, ComponentLink10Description=https://datasheet.ciiva.com/17275/fdn306p-17275114.pdf?src-supplier=Future+Electronics, ComponentLink10URL=https://datasheet.ciiva.com/17275/fdn306p-17275114.pdf?src-supplier=Future+Electronics, ComponentLink11Description=https://datasheet.ciiva.com/22655/fdn306p-22655327.pdf?src-supplier=Element14, ComponentLink11URL=https://datasheet.ciiva.com/22655/fdn306p-22655327.pdf?src-supplier=Element14, Contact Plating=Tin,Matte, Dual Supply Voltage=-12V, Element Configuration=Single, Fall Time=10ns, Height=0.94mm, Lead Free="Lead Free", Length=2.92mm, Manufacturer Part Number=FDN306P, Mount="Surface Mount", Nominal Vgs=-600mV, Number of Elements=1, Number of Pins=3, On-State Resistance=40MR, Packaging="Tape and Reel", Polarity=P-CHANNEL, Power Dissipation=500mW, Pricing 1="1=0.59000, 10=0.50700, 25=0.47360, 100=0.37880, 500=0.29766, 1000=0.23001 (USD)", Radiation Hardening=No, Rds On Max=40mR, REACH SVHC="No SVHC", Rise Time=10ns, RoHS=Yes, RoHS Compliant=Yes, Series=PowerTrench®, Stock 1=12409, Supplier 1=Digi-Key, Termination=SMD/SMT, Turn-Off Delay Time=38ns, Turn-On Delay Time=11ns, Voltage=12V, Voltage Rating (DC)=-12V, Width=1.4mm
Q3: "Trans Gp Bjt NPN 25V 1.5A 300MW 3-PIN SOT-23 T/r", Case/Package=TO-236-3, Collector Emitter Breakdown Voltage=25V, Collector Emitter Voltage (VCEO)=400mV, LCSC Part Number=C105433, Manufacturer=Comchip, Manufacturer Part Number=SS8050-G, Max Collector Current=1.5A, Max Power Dissipation=300mW, Transition Frequency=100MHz, ComponentLink1Description="http://www.comchiptech.com/admin/files/product/SS8050-G RevA181526.pdf?src-supplier=Digi-Key", ComponentLink1URL="http://www.comchiptech.com/admin/files/product/SS8050-G RevA181526.pdf?src-supplier=Digi-Key", ComponentLink2Description=http://www.comchiptech.com/cms/UserFiles/SS8050-G%20RevA181526.pdf?src-supplier=Digi-Key, ComponentLink2URL=http://www.comchiptech.com/cms/UserFiles/SS8050-G%20RevA181526.pdf?src-supplier=Digi-Key, Max Breakdown Voltage=25V, Mount="Surface Mount", Packaging="Tape and Reel", Pricing 1="1=0.26480, 10=0.19960, 25=0.19760, 50=0.19590, 100=0.09990, 250=0.09890, 500=0.07670, 1000=0.05180 (USD)", RoHS=Yes, Stock 1=2514, Supplier 1="Arrow Electronics", Supplier Part Number 1=SS8050-G
R1 R2 Rx1: library part CRGH0603J10K, "RES SMD 10K OHM 5% 1/5W 0603", Case Code (Imperial)=0603, Case Code (Metric)=1608, LCSC Part Number=C2092011, Manufacturer="TE Connectivity Holsworthy", Max Operating Temperature=125°C, Min Operating Temperature=-55°C, Number of Resistors=1, Power Rating=200mW, Resistance=10kR, Resistance Tolerance=5%, Resistor Type="Thick Film,Power resistor", Supplier Part Number 1=A126394DKR-ND, Temperature Coefficient=100ppm/°C, Voltage Rating=50V, Case/Package=0603, ComponentLink1Description=http://www.farnell.com/datasheets/2167052.pdf?src-supplier=Element14, ComponentLink1URL=http://www.farnell.com/datasheets/2167052.pdf?src-supplier=Element14, ComponentLink2Description=https://www.rohm.com/datasheet/ESR01MZPF/esr-e?src-supplier=Digi-Key, ComponentLink2URL=https://www.rohm.com/datasheet/ESR01MZPF/esr-e?src-supplier=Digi-Key, ComponentLink3Description=http://www.farnell.com/datasheets/2007183.pdf?src-supplier=Element14, ComponentLink3URL=http://www.farnell.com/datasheets/2007183.pdf?src-supplier=Element14, Depth=0.8mm, ELV=Compliant, Height=0.45mm, Length=1.6mm, Manufacturer Part Number=CRGH0603J10K, Mount="Surface Mount", Number of Terminations=2, Packaging="Tape and Reel", Pricing 1="1=0.1, 10=0.049, 100=0.02, 1000=0.00899, 2500=0.0078 (USD)", REACH SVHC="No SVHC", RoHS Compliant=Yes, Series=CRGH, Stock 1=85818, Supplier 1=Digi-Key, Technology="THICK FILM", Termination=Solder, Tolerance=5%, Voltage Rating (DC)=50V, Width=0.8mm
R3 R4 R5: library part CN24JTN331, "4 8 ±5% 330Ω 62.5mW ±250ppm/℃ 0402x4 Resistor Networks & Arrays ROHS", LCSC Part Number=C162973, Manufacturer="TA-I Tech", Package=0402x4, ComponentLink1Description=LCSC, ComponentLink1URL=https://www.lcsc.com/product-detail/span-style-background-color-ff0-Resistor-span-Networks-Arrays_TA-I-Tech-CN24JTN331_C162973.html, Item Type="Resistor Array", Manufacturer Part Number=CN24JTN331
R6 R7 R8: library part ERJ-2RKF47R0X, "RES SMD 47 OHM 1% 1/10W 0402", Case Code (Imperial)=0402, Case Code (Metric)=1005, LCSC Part Number=C413056, Manufacturer=Panasonic, Max Operating Temperature=155°C, Max Power Dissipation=100mW, Min Operating Temperature=-55°C, Package Quantity=1, Resistance Tolerance=1%, Resistor Type="Thick Film", Supplier Part Number 1=64R5286, Temperature Coefficient=100ppm/°C, Voltage Rating=50V, Case/Package=0402, Category="Chip SMD Resistors", ComponentLink1Description=https://datasheet.ciiva.com/11821/0900766b80f80784-11821333.pdf?src-supplier=RSComponents, ComponentLink1URL=https://datasheet.ciiva.com/11821/0900766b80f80784-11821333.pdf?src-supplier=RSComponents, ComponentLink2Description=https://datasheet.ciiva.com/6082/aoa0000ce2-6082054.pdf?src-supplier=Farnell, ComponentLink2URL=https://datasheet.ciiva.com/6082/aoa0000ce2-6082054.pdf?src-supplier=Farnell, ComponentLink3Description=https://datasheet.ciiva.com/7886/aoa0000ce2-7886719.pdf?src-supplier=Element14, ComponentLink3URL=https://datasheet.ciiva.com/7886/aoa0000ce2-7886719.pdf?src-supplier=Element14, ComponentLink4Description=https://datasheet.ciiva.com/7887/426256-7887019.pdf?src-supplier=Element14, ComponentLink4URL=https://datasheet.ciiva.com/7887/426256-7887019.pdf?src-supplier=Element14, ComponentLink5Description=https://datasheet.ciiva.com/43467/1678782-43467189.pdf?src-supplier=Farnell, ComponentLink5URL=https://datasheet.ciiva.com/43467/1678782-43467189.pdf?src-supplier=Farnell, ComponentLink6Description=https://datasheet.ciiva.com/46373/1678782-46373909.pdf?src-supplier=Element14, ComponentLink6URL=https://datasheet.ciiva.com/46373/1678782-46373909.pdf?src-supplier=Element14, ComponentLink7Description=https://datasheet.ciiva.com/22684/1678782-22684775.pdf?src-supplier=Element14, ComponentLink7URL=https://datasheet.ciiva.com/22684/1678782-22684775.pdf?src-supplier=Element14, ComponentLink8Description=https://datasheet.ciiva.com/46373/1678782-46373910.pdf?src-supplier=Element14, ComponentLink8URL=https://datasheet.ciiva.com/46373/1678782-46373910.pdf?src-supplier=Element14, ComponentLink9Description=https://datasheet.ciiva.com/24165/aoa0000ce2-24165246.pdf?src-supplier=Mouser, ComponentLink9URL=https://datasheet.ciiva.com/24165/aoa0000ce2-24165246.pdf?src-supplier=Mouser, ComponentLink10Description=https://datasheet.ciiva.com/16786/70260748-16786359.pdf?src-supplier=Allied+Electronics, ComponentLink10URL=https://datasheet.ciiva.com/16786/70260748-16786359.pdf?src-supplier=Allied+Electronics, ComponentLink11Description=https://datasheet.ciiva.com/16783/70260748-16783259.pdf?src-supplier=Allied+Electronics, ComponentLink11URL=https://datasheet.ciiva.com/16783/70260748-16783259.pdf?src-supplier=Allied+Electronics, ComponentLink12Description=https://datasheet.ciiva.com/9189/aoa0000ce2-9189325.pdf?src-supplier=Avnet, ComponentLink12URL=https://datasheet.ciiva.com/9189/aoa0000ce2-9189325.pdf?src-supplier=Avnet, ComponentLink13Description=https://datasheet.ciiva.com/9189/aoa0000ce2-9189323.pdf?src-supplier=Avnet, ComponentLink13URL=https://datasheet.ciiva.com/9189/aoa0000ce2-9189323.pdf?src-supplier=Avnet, Construction=Rectangular, Contact Plating=Tin, Depth=0.5mm, Features="Automotive AEC-Q200", Height=0.35mm, Item Type=Resistor, Lead Free="Lead Free", Length=1mm, Manufacturer Part Number=ERJ-2RKF47R0X, Military Standard=Not, Mount="Surface Mount", Number of Pins=2, Number of Terminations=2, Packaging="Tape and Reel", Power Rating=100mW, Pricing 1="1=0.08100, 25=0.03700, 100=0.01500, 250=0.01300, 500=0.01000, 1000=0.00700, 2500=0.00500 (USD)", Reach SVHC Compliant=Yes, Resistance=47R, RoHS=Yes, RoHS Compliant=Yes, Series=ERJ, Stock 1=48669, Supplier 1=Avnet, Technology="THICK FILM", Termination=SMD/SMT, Tolerance=1%, Voltage Rating (DC)=50V, Weight=2.8E-05oz, Width=0.5mm
R12 R13: library part ERJ-PA2F5101X, "RES SMD 5.1 KOHM 1% 1/5W 0402", Manufacturer=Panasonic, Supplier Part Number 1=P124488DKR-ND, Manufacturer Part Number=ERJ-PA2F5101X, Pricing 1="1=0.22, 10=0.183, 100=0.0717, 1000=0.03002, 2500=0.02751, 5000=0.02501 (USD)", Stock 1=5235, Supplier 1=Digi-Key
R14: library part RC0603FR-071ML, "RES SMD 1M OHM 1% 1/10W 0603", Case Code (Imperial)=0603, Case Code (Metric)=1608, LCSC Part Number=C105578, Manufacturer=Yageo, Max Operating Temperature=155°C, Min Operating Temperature=-55°C, Package Quantity=5000, Power Rating=100mW, Resistance=1MR, Supplier Part Number 1=311-1.00MHRDKR-ND, Temperature Coefficient=100ppm/°C, Tolerance=1%, Voltage Rating=50V, Case/Package=0603, ComponentLink1Description=http://www.farnell.com/datasheets/2167052.pdf?src-supplier=Mouser, ComponentLink1URL=http://www.farnell.com/datasheets/2167052.pdf?src-supplier=Mouser, ComponentLink2Description=http://www.farnell.com/datasheets/2167052.pdf?src-supplier=Element14, ComponentLink2URL=http://www.farnell.com/datasheets/2167052.pdf?src-supplier=Element14, ComponentLink3Description=http://documents.rs-components.com/techlib://itc_doclist_GB.htm?stockno=5048956&src-supplier=RSComponents, ComponentLink3URL=http://documents.rs-components.com/techlib://itc_doclist_GB.htm?stockno=5048956&src-supplier=RSComponents, Composition="Thick Film", Depth=0.8mm, Height=0.45mm, Lead Free="Lead Free", Length=1.6mm, Manufacturer Part Number=RC0603FR-071ML, Military Standard=Not, Number of Pins=2, Packaging="Tape and Reel", Pricing 1="1=0.1, 10=0.023, 100=0.0094, 1000=0.00421, 2500=0.00366 (USD)", REACH SVHC="No SVHC", Stock 1=3824601, Supplier 1=Digi-Key, Termination=SMD/SMT, Voltage Rating (DC)=50V, Width=0.8mm
R16: library part RC0402FR-07100KL, "RES 100K OHM 1% 1/16W 0402", Case Code (Imperial)=0402, Case Code (Metric)=1005, Manufacturer=Yageo, Max Operating Temperature=155°C, Max Power Dissipation=63mW, Min Operating Temperature=-55°C, Package Quantity=1, Resistance=100kR, Resistance Tolerance=1%, Resistor Type="Thick Film", Supplier Part Number 1=603-RC0402FR-07100KL, Temperature Coefficient=100ppm/°C, Voltage Rating=50V, Case/Package=0402, Category="Chip SMD Resistors", ComponentLink1Description=https://datasheet.ciiva.com/11819/0900766b80c66297-11819452.pdf?src-supplier=RSComponents, ComponentLink1URL=https://datasheet.ciiva.com/11819/0900766b80c66297-11819452.pdf?src-supplier=RSComponents, ComponentLink2Description=https://datasheet.ciiva.com/22747/1018594-22747509.pdf?src-supplier=Element14, ComponentLink2URL=https://datasheet.ciiva.com/22747/1018594-22747509.pdf?src-supplier=Element14, ComponentLink3Description=https://datasheet.ciiva.com/2453/pyu-r-int-thick-7-2453362.pdf?src-supplier=Digi-Key, ComponentLink3URL=https://datasheet.ciiva.com/2453/pyu-r-int-thick-7-2453362.pdf?src-supplier=Digi-Key, ComponentLink4Description=https://datasheet.ciiva.com/2453/pyu-r-int-thick-7-2453363.pdf?src-supplier=Digi-Key, ComponentLink4URL=https://datasheet.ciiva.com/2453/pyu-r-int-thick-7-2453363.pdf?src-supplier=Digi-Key, ComponentLink5Description=https://datasheet.ciiva.com/2453/pyu-r-int-thick-7-2453361.pdf?src-supplier=Digi-Key, ComponentLink5URL=https://datasheet.ciiva.com/2453/pyu-r-int-thick-7-2453361.pdf?src-supplier=Digi-Key, ComponentLink6Description=https://datasheet.ciiva.com/12667/pyu-rc0402-51-rohs-l-6-r-12667930.pdf?src-supplier=Mouser, ComponentLink6URL=https://datasheet.ciiva.com/12667/pyu-rc0402-51-rohs-l-6-r-12667930.pdf?src-supplier=Mouser, ComponentLink7Description=https://datasheet.ciiva.com/15189/getdatasheetpartid-323696-15189334.pdf?src-supplier=Verical, ComponentLink7URL=https://datasheet.ciiva.com/15189/getdatasheetpartid-323696-15189334.pdf?src-supplier=Verical, Construction=Rectangular, Depth=0.5mm, Features="Moisture Resistant", Height=0.016inch, Lead Free="Lead Free", Length=0.039inch, Manufacturer Part Number=RC0402FR-07100KL, Military Standard=Not, Number of Terminations=2, Packaging="Tape and Reel", Power Rating=63mW, Pricing 1="1=0.10000, 10=0.01200, 50=0.01200, 100=0.00500, 1000=0.00300, 2500=0.00200, 10000=0.00100 (USD)", REACH SVHC="No SVHC", RoHS=Yes, RoHS Compliant=Yes, Series=RC, Stock 1=7759549, Supplier 1=Mouser, Technology="THICK FILM", Termination=SMD/SMT, Tolerance=1%, Width=0.02inch, Working Voltage=50V
R17 R18 R50: library part RC0603FR-0710KL, "RES SMD 10K Ohm 1% 1/10W 0603", Case Code (Imperial)=0603, Case Code (Metric)=1608, LCSC Part Number=C98220, Manufacturer=Yageo, Max Operating Temperature=155°C, Max Power Dissipation=100mW, Min Operating Temperature=-55°C, Resistance=10kR, Resistance Tolerance=1%, Resistor Type="Thick Film", Supplier Part Number 1=311-10.0KHRCT-ND, Temperature Coefficient=100ppm/°C, Voltage Rating=75V, Voltage Rating (DC)=50V, Case/Package=0603, Category="Chip SMD Resistors", ComponentLink1Description=https://datasheet.ciiva.com/7660/38590-7660789.pdf?src-supplier=Element14, ComponentLink1URL=https://datasheet.ciiva.com/7660/38590-7660789.pdf?src-supplier=Element14, ComponentLink2Description=https://datasheet.ciiva.com/7983/443971-7983596.pdf?src-supplier=Element14, ComponentLink2URL=https://datasheet.ciiva.com/7983/443971-7983596.pdf?src-supplier=Element14, ComponentLink3Description=https://datasheet.ciiva.com/22747/443971-22747519.pdf?src-supplier=Element14, ComponentLink3URL=https://datasheet.ciiva.com/22747/443971-22747519.pdf?src-supplier=Element14, ComponentLink4Description=https://datasheet.ciiva.com/46440/1868787-46440891.pdf?src-supplier=Element14, ComponentLink4URL=https://datasheet.ciiva.com/46440/1868787-46440891.pdf?src-supplier=Element14, ComponentLink5Description=https://datasheet.ciiva.com/7746/1738695-7746239.pdf?src-supplier=Element14, ComponentLink5URL=https://datasheet.ciiva.com/7746/1738695-7746239.pdf?src-supplier=Element14, ComponentLink6Description=https://datasheet.ciiva.com/15189/getdatasheetpartid-409289-15189591.pdf?src-supplier=Verical, ComponentLink6URL=https://datasheet.ciiva.com/15189/getdatasheetpartid-409289-15189591.pdf?src-supplier=Verical, Construction=Rectangular, Depth=0.8mm, Features="Moisture Resistant", Height=0.45mm, Lead Free="Lead Free", Lead Pitch=0.3mm, Length=1.6mm, Manufacturer Part Number=RC0603FR-0710KL, Military Standard=Not, Number of Pins=2, Number of Terminations=2, Packaging="Tape and Reel", Power Rating=100mW, Pricing 1="1=0.10000, 10=0.02400, 100=0.00970, 1000=0.00436, 2500=0.00378 (USD)", REACH SVHC=Unknown, RoHS=Yes, RoHS Compliant=Yes, Series=RC, Size Code=0603, Stock 1=25249139, Supplier 1=Digi-Key, Termination=SMD/SMT, Tolerance=1%, Weight=7.1E-05oz, Width=0.8mm
R20 R21 R22 R23 R24 R25 R26 R27 R28 R29: library part RC0402FR-07100RL, "RES 100 OHM 1% 1/16W 0402", Case Code (Imperial)=0402, Case Code (Metric)=1005, LCSC Part Number=C106232, Manufacturer=Yageo, Max Operating Temperature=155°C, Max Power Dissipation=63mW, Min Operating Temperature=-55°C, Power Rating=62.5mW, Resistance Tolerance=1%, Resistor Type="Thick Film", Supplier Part Number 1=603-RC0402FR-07100RL, Temperature Coefficient=100ppm/°C, Voltage Rating=50V, Case/Package=0402, Category="Chip SMD Resistors", ComponentLink1Description=https://datasheet.ciiva.com/11808/0900766b80c66297-11808765.pdf?src-supplier=RSComponents, ComponentLink1URL=https://datasheet.ciiva.com/11808/0900766b80c66297-11808765.pdf?src-supplier=RSComponents, ComponentLink2Description=https://datasheet.ciiva.com/7849/1784430-7849810.pdf?src-supplier=Element14, ComponentLink2URL=https://datasheet.ciiva.com/7849/1784430-7849810.pdf?src-supplier=Element14, ComponentLink3Description=https://datasheet.ciiva.com/28367/1018594-28367226.pdf?src-supplier=Element14, ComponentLink3URL=https://datasheet.ciiva.com/28367/1018594-28367226.pdf?src-supplier=Element14, ComponentLink4Description=https://datasheet.ciiva.com/22747/1018594-22747511.pdf?src-supplier=Element14, ComponentLink4URL=https://datasheet.ciiva.com/22747/1018594-22747511.pdf?src-supplier=Element14, ComponentLink5Description=https://datasheet.ciiva.com/12667/pyu-rc0402-51-rohs-l-6-r-12667957.pdf?src-supplier=Mouser, ComponentLink5URL=https://datasheet.ciiva.com/12667/pyu-rc0402-51-rohs-l-6-r-12667957.pdf?src-supplier=Mouser, ComponentLink6Description=https://datasheet.ciiva.com/15189/getdatasheetpartid-329466-15189335.pdf?src-supplier=Verical, ComponentLink6URL=https://datasheet.ciiva.com/15189/getdatasheetpartid-329466-15189335.pdf?src-supplier=Verical, ComponentLink7Description=https://datasheet.ciiva.com/16740/pyu-rc0402-51-rohs-l-6-r-16740566.pdf?src-supplier=Future+Electronics, ComponentLink7URL=https://datasheet.ciiva.com/16740/pyu-rc0402-51-rohs-l-6-r-16740566.pdf?src-supplier=Future+Electronics, Construction=Rectangular, Depth=0.5mm, Features="Moisture Resistant", Height=0.32mm, Lead Free="Lead Free", Length=1mm, Manufacturer Part Number=RC0402FR-07100RL, Military Standard=Not, Number of Pins=2, Number of Terminations=2, Packaging="Tape and Reel", Pricing 1="1=0.10000, 10=0.01200, 50=0.01200, 100=0.00500, 1000=0.00300, 2500=0.00200, 10000=0.00100 (USD)", REACH SVHC="No SVHC", Resistance=100R, RoHS=Yes, RoHS Compliant=Yes, Series=RC, Size Code=0402, Stock 1=699545, Supplier 1=Mouser, Technology="THICK FILM", Termination=SMD/SMT, Tolerance=1%, Voltage Rating (DC)=50V, Width=0.5mm
SW1: "3.5mm 3.5mm SMDSplicing Black Rectangle button 50mA Surface Mount 7mm SPST 100MΩ 20000 12V 250gf@±50gf SMD Tactile Switches ROHS", LCSC Part Number=C2910695, Manufacturer=YIYUAN, Package=Custom, ComponentLink1Description=LCSC, ComponentLink1URL=https://lcsc.com/product-detail/Tactile-Switches_YIYUAN-YTS-B003-2A_C2910695.html, Item Type=Switch, Manufacturer Part Number=YTS-B003-2A
U1: "RF TXRX MOD WIFI SURFACE MOUNT", LCSC Part Number=C2980296, Manufacturer="Espressif Systems", Supplier Part Number 1=1965-ESP32-S3-WROOM-1U-N4CT-ND, Category=Uncategorized, ComponentLink1Description=LCSC, ComponentLink1URL=https://www.lcsc.com/product-detail/WiFi-Modules_Espressif-Systems-ESP32-WROOM-32-N4_C82899.html, Item Type=Module, Manufacturer Part Number=ESP32-S3-WROOM-1U-N4, Pricing 1="1=3.25000 (USD)", RoHS=No, Stock 1=594, Supplier 1=Digi-Key
U2: "DFN-6-EP(2x2) Temperature and Humidity Sensor ROHS", LCSC Part Number=C2837688, Manufacturer=GXCAS, Package=DFN-6-EP(2x2), ComponentLink1Description=LCSC, ComponentLink1URL=https://www.lcsc.com/product-detail/Temperature-and-Humidity-Sensor_GXCAS-GXHTC3_C2837688.html, Item Type="Temperature & Humidity Sensor", Manufacturer Part Number=GXHTC3